# Altium PCB Fuse_layout.PcbDoc
Units mil, origin at the board's own origin, x right, y up, seen from the top; angles counter-clockwise.
Board outline 4500 x 9500 mil, 4 copper layers (Top Layer, GND, Power, Bottom Layer), stack 29.224 mil thick; 152 components, 75 nets, 438 pads, 8 vias.
Unrouted connection lines stored in the file: 156.
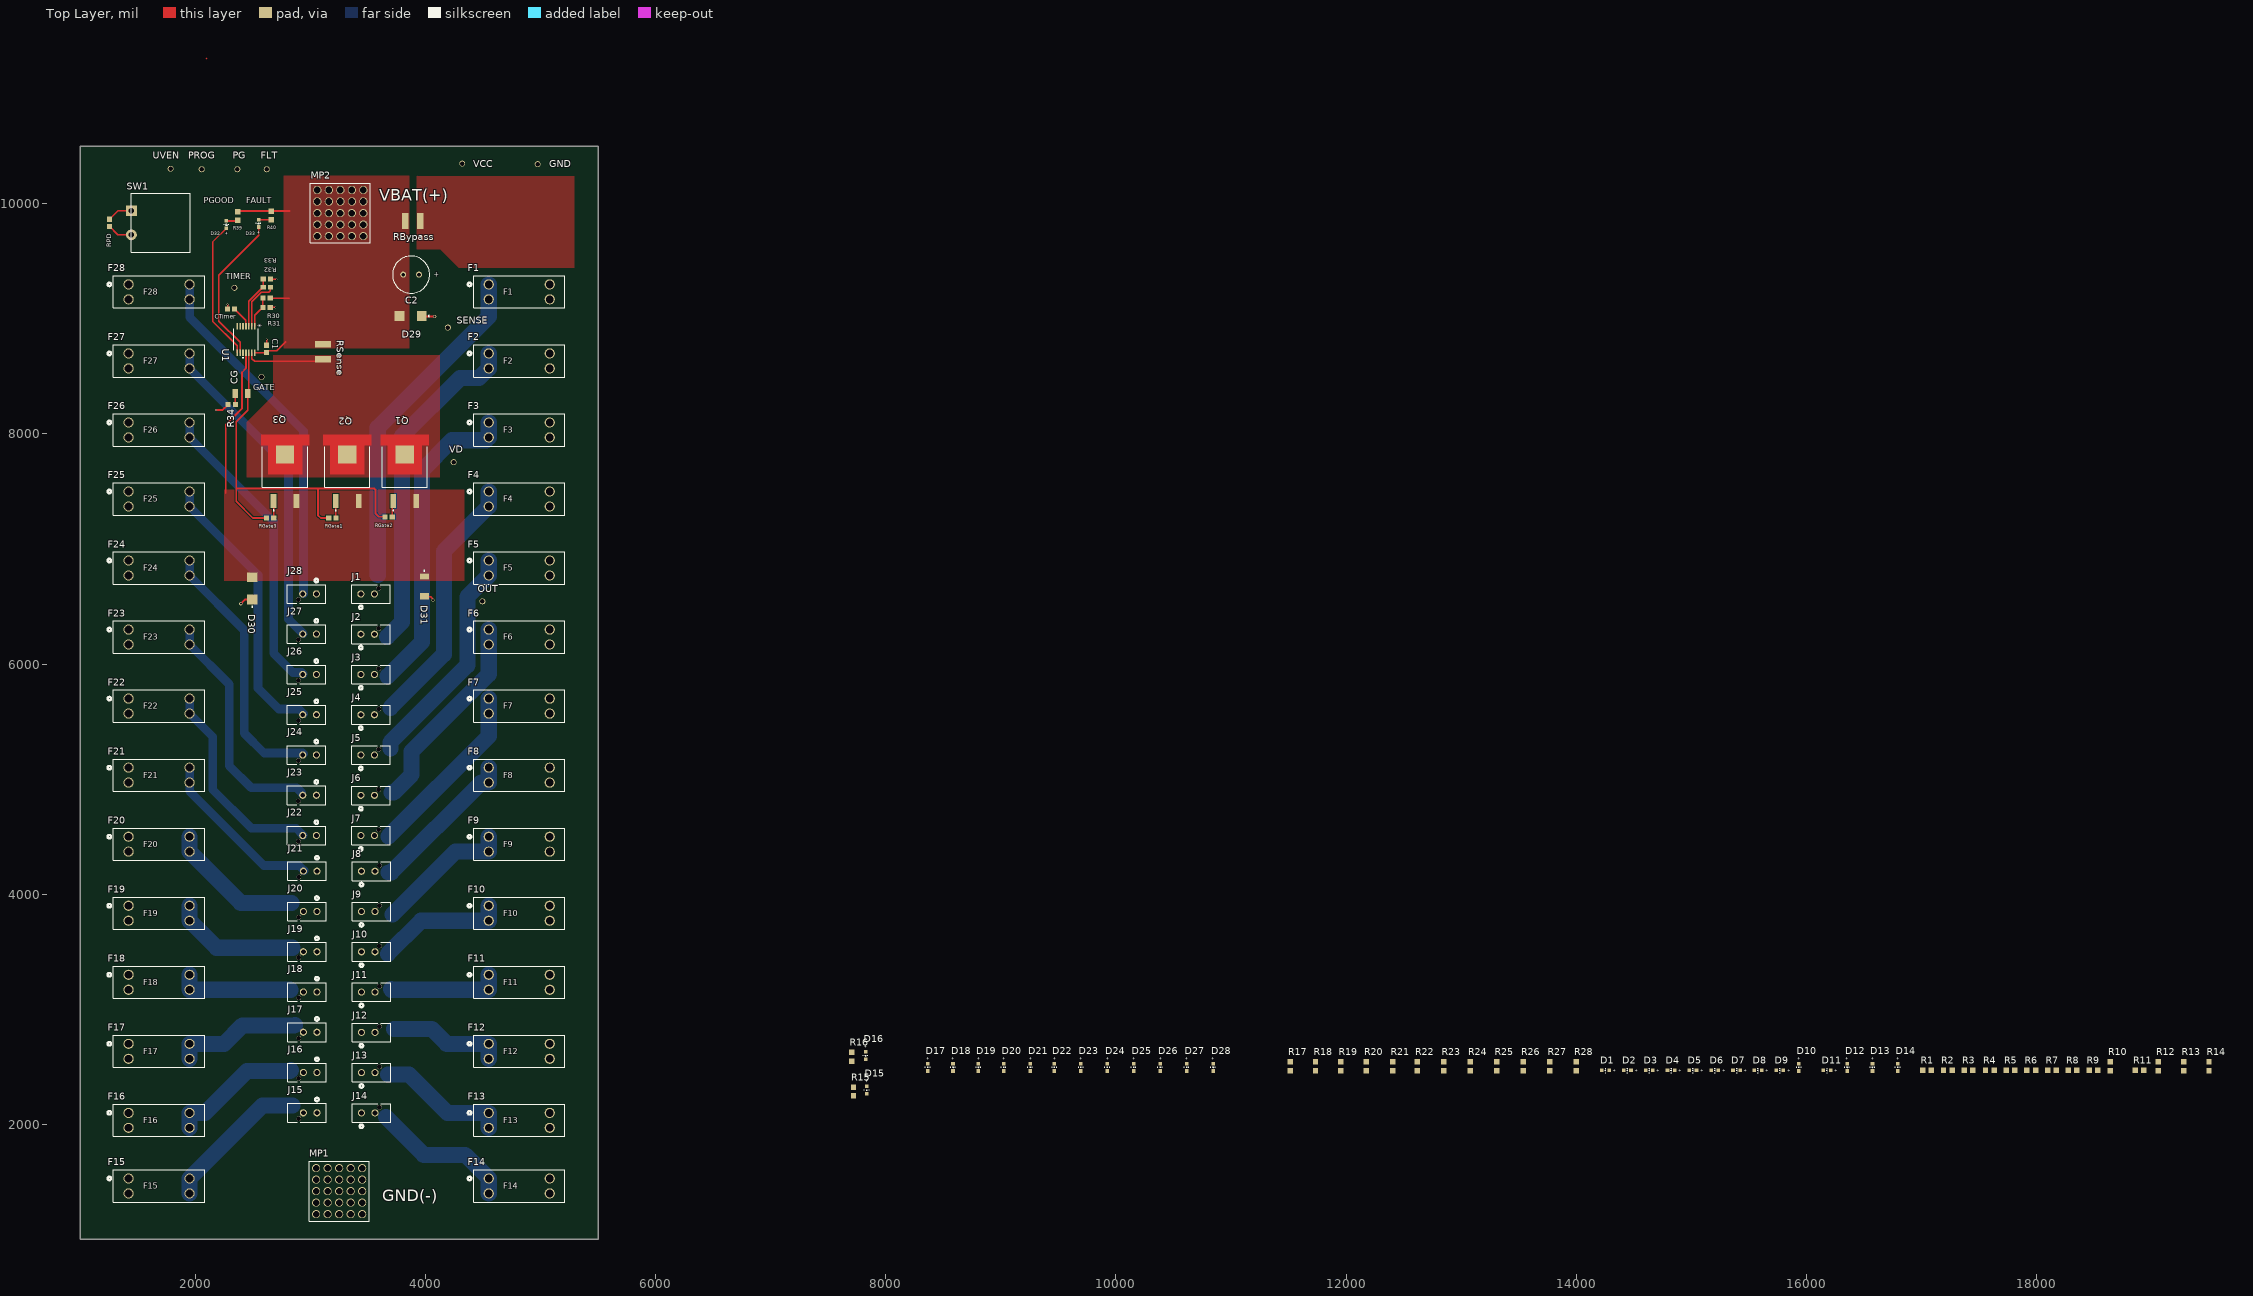
[diagram p0: Top Layer view]
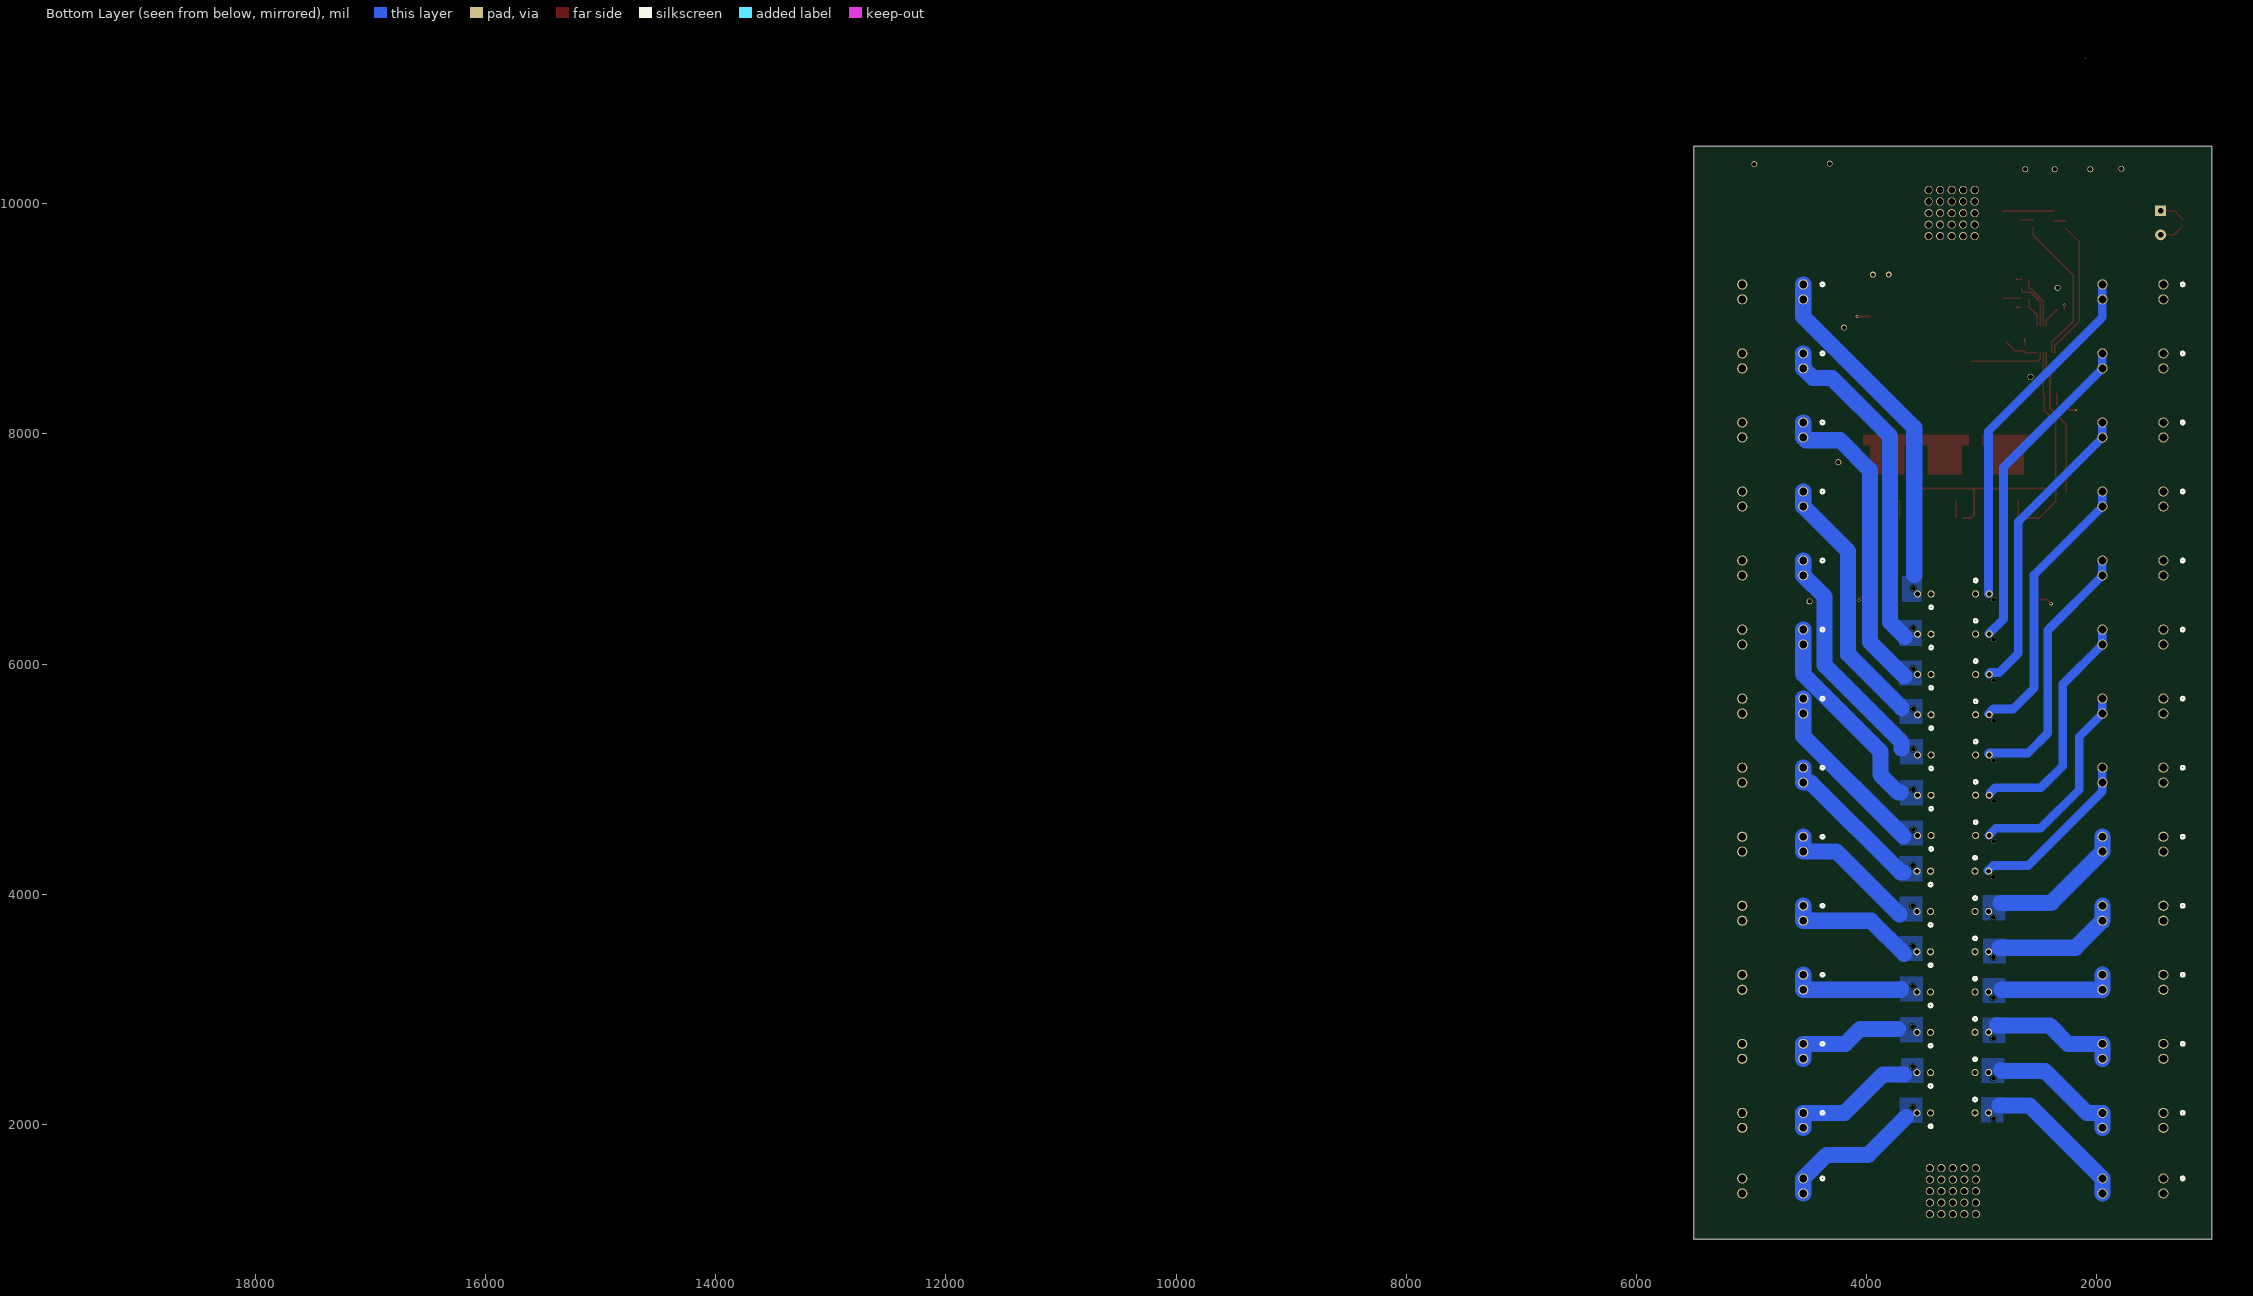
[diagram p1: Bottom Layer view, seen from below]
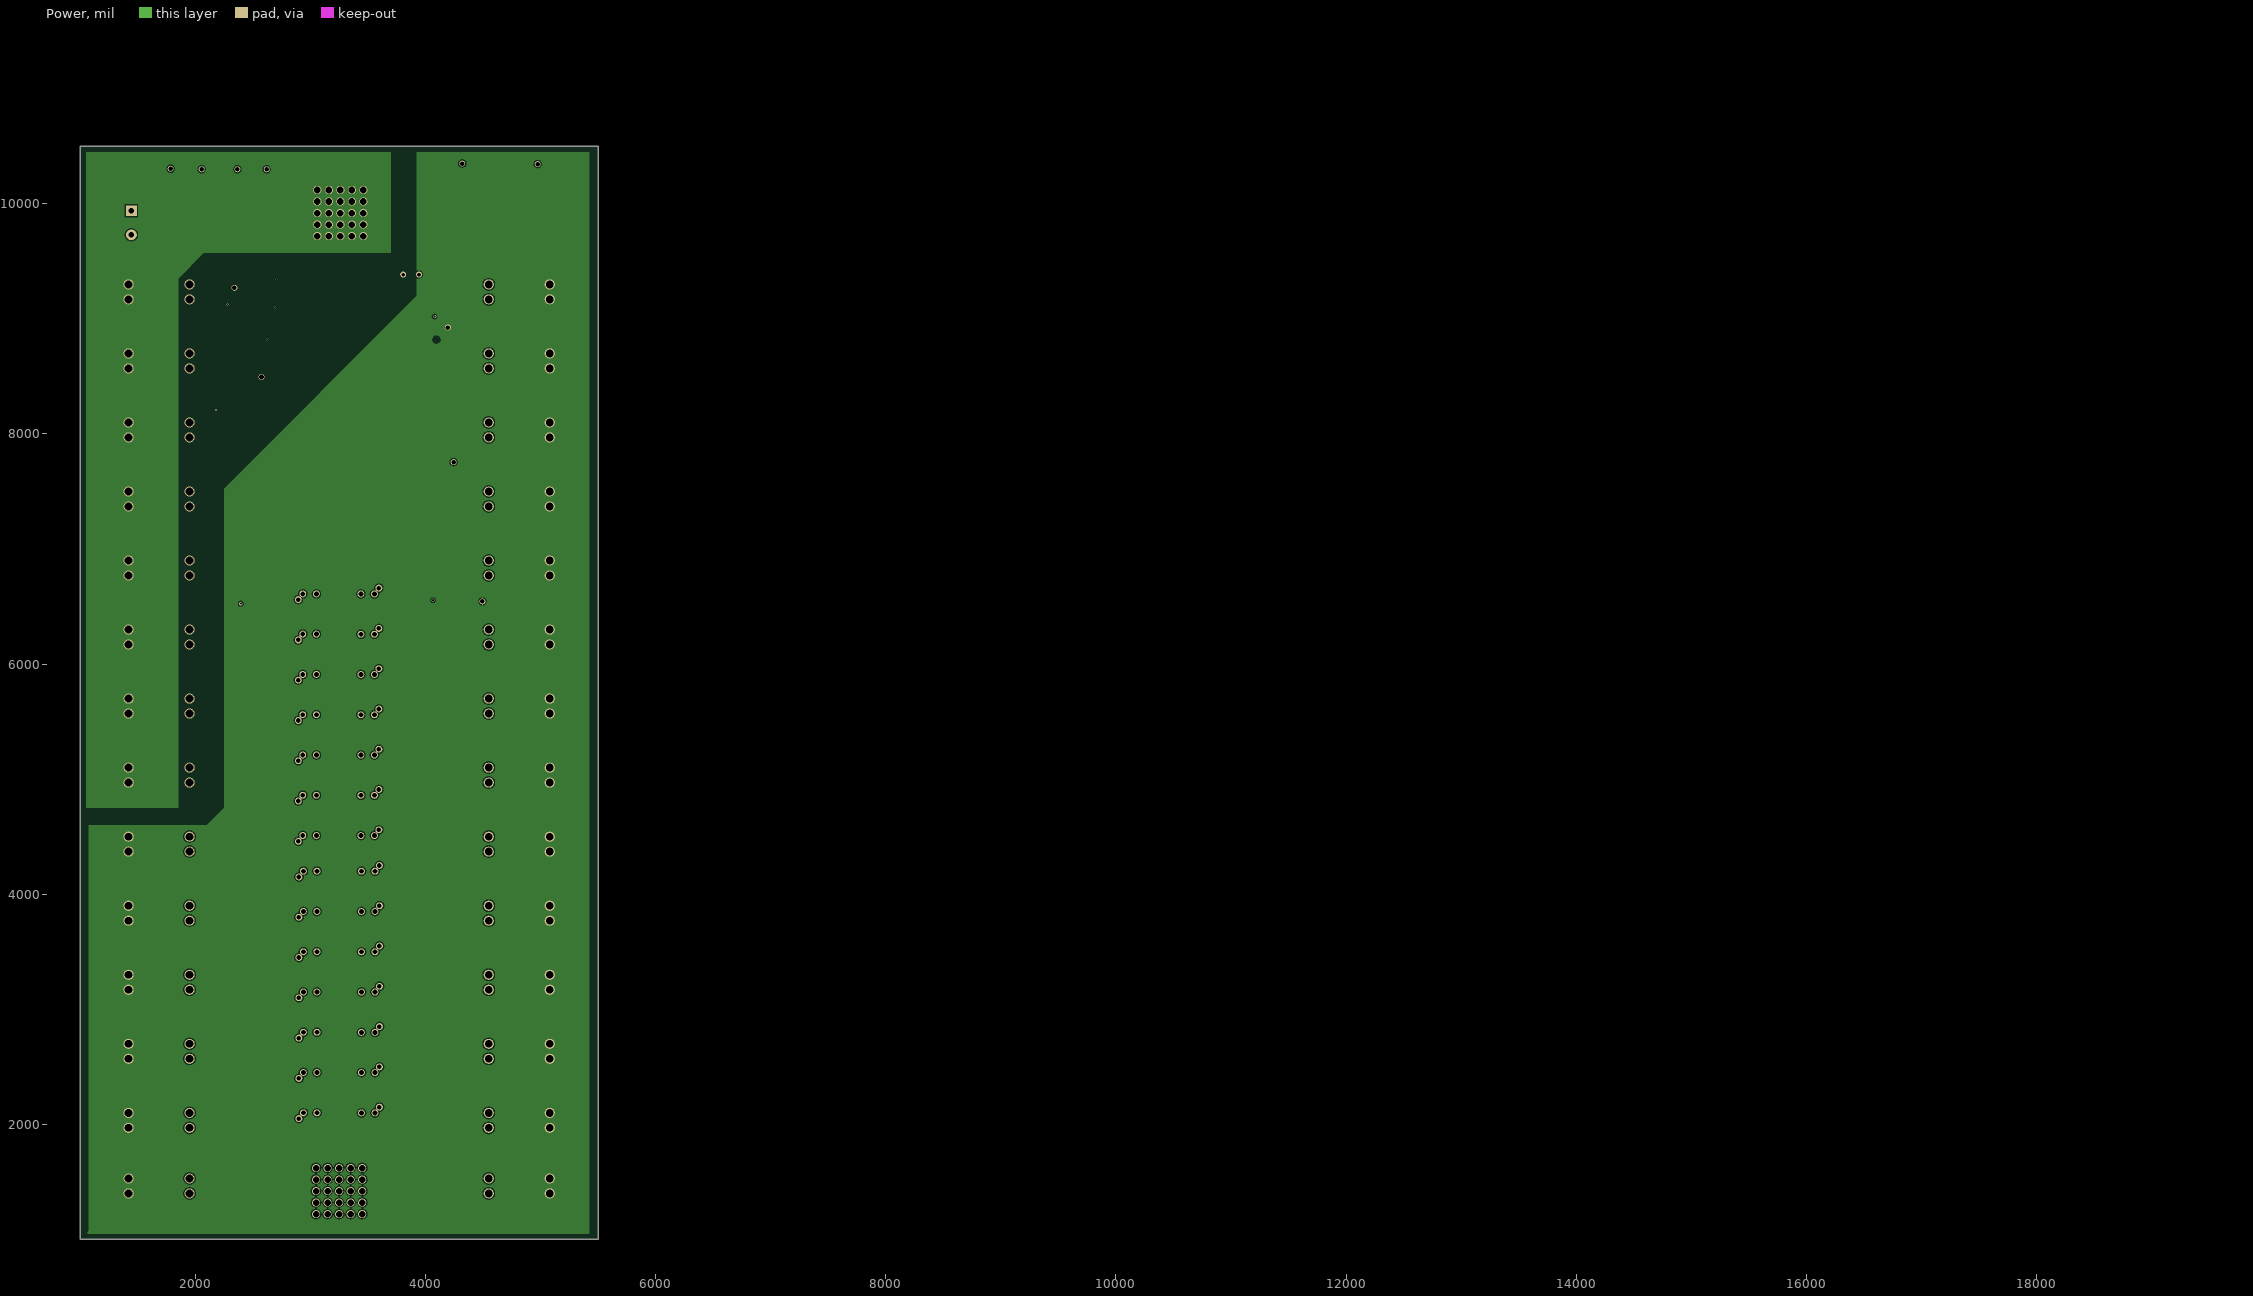
[diagram p2: Power]

## Layer stack, top to bottom
Top Solder: solder mask 0.4, Solder Resist, Dk 3.5
Top Layer: signal copper 2.7559
Dielectric 2: prepreg 2.8, PP-006, Dk 4.1
GND: signal copper 2.7559
Dielectric 1: dielectric 12.6, FR-4, Dk 4.8
Power: signal copper 2.7559
Dielectric 3: prepreg 2.8, PP-006, Dk 4.1
Bottom Layer: signal copper 2.7559
Bottom Solder: solder mask 0.4, Solder Resist, Dk 3.5

## Board outline
1000,1000 5500,1000 5500,10500 1000,10500

## Design rules (kind name [scope] priority, off if disabled: settings)
Clearance [All] p1: gap=10 ignorepadtopadclearanceinfootprint=TRUE
PolygonConnect PolygonConnect_1 [InNet('VBAT') vs InNetClass('Vbat')] p1: connectstyle=Direct reliefconductorwidth=50 reliefentries=4 polygonreliefangle="90 Angle" airgapwidth=10
PolygonConnect [All] p2: connectstyle=Direct reliefconductorwidth=10 reliefentries=4 polygonreliefangle="90 Angle" airgapwidth=10
RoutingVias [All] p1: holewidth=7.87 width=15.75 viastyle="Through Hole" minholewidth=7.87 minwidth=15.75 maxholewidth=17.72 maxwidth=39.37
SolderMaskExpansion [All] p1: expansion=4 istentingtop=FALSE
SupplyNets "Schematic Supply Nets_1" [InNet('GND')] p1: voltage=0.000
SupplyNets "Schematic Supply Nets" [InNet('VBAT')] p2: voltage=0.000
Width [All] p1: maxlimit=500 minlimit=10 preferedwidth=10 minimp=50.000000 maximp=50.000000 favimp=50.000000
30 further rules are at their usual default settings.

## Classes and differential pairs
component class "Status LEDs": D1 D2 D3 D4 D5 D6 D7 D8 D9 D10 D11 D12 D13 D14 D15 D16 D17 D18 D19 D20 D21 D22 D23 D24 D25 D26 D27 D28 R1 R2 R3 R4 R5 R6 R7 R8 R9 R10 R11 R12 R13 R14 R15 R16 R17 R18 R19 R20 R21 R22 R23 R24 R25 R26 R27 R28 RPD SW1
component class Soft_Start: C1 C2 CG CTimer D29 D30 D31 D32 D33 FLT GATE GND OUT PG PROG Q1 Q2 Q3 R30 R31 R32 R33 R34 R39 R40 RBypass RGate1 RGate2 RGate3 RSense SENSE TIMER U1 UVEN VCC VD
component class "Power Distribution": F1 F2 F3 F4 F5 F6 F7 F8 F9 F10 F11 F12 F13 F14 F15 F16 F17 F18 F19 F20 F21 F22 F23 F24 F25 F26 F27 F28 J1 J2 J3 J4 J5 J6 J7 J8 J9 J10 J11 J12 J13 J14 J15 J16 J17 J18 J19 J20 J21 J22 J23 J24 J25 J26 J27 J28 MP1 MP2

## Components (designator, comment, footprint, x,y, rotation, side; value= is the part's Value field where it differs from the comment)
C1 "GRM1885C1H103JA01D" CAP-0603 2620,8740 r90 top
C2 "CAP THRU" WCAP-ATUL_8X11.5(DXL) 3875,9385 r0 top value=47uF
CG "CAP 1206" CAP-1206 2400.87,8350 r180 top
CTimer "CAP 0603" CAP-0603 2310,9085 r180 top
D1 "150060GS75000" WL-SMCW_0603 14255,2470 r0 top
D2 "150060GS75000" WL-SMCW_0603 14445,2470 r0 top
D3 "150060GS75000" WL-SMCW_0603 14635,2470 r0 top
D4 "150060GS75000" WL-SMCW_0603 14825,2470 r0 top
D5 "150060GS75000" WL-SMCW_0603 15015,2470 r0 top
D6 "150060GS75000" WL-SMCW_0603 15205,2470 r0 top
D7 "150060GS75000" WL-SMCW_0603 15395,2470 r0 top
D8 "150060GS75000" WL-SMCW_0603 15580,2470 r0 top
D9 "150060GS75000" WL-SMCW_0603 15770,2470 r0 top
D10 "150060GS75000" WL-SMCW_0603 15935,2495 r90 top
D11 "150060GS75000" WL-SMCW_0603 16180,2470 r0 top
D12 "150060GS75000" WL-SMCW_0603 16355,2495 r90 top
D13 "150060GS75000" WL-SMCW_0603 16575,2495 r90 top
D14 "150060GS75000" WL-SMCW_0603 16795,2495 r90 top
D15 "150060GS75000" WL-SMCW_0603 7835,2298.5 r90 top
D16 "150060GS75000" WL-SMCW_0603 7825,2598.5 r90 top
D17 "150060GS75000" WL-SMCW_0603 8365,2495 r90 top
D18 "150060GS75000" WL-SMCW_0603 8585,2495 r90 top
D19 "150060GS75000" WL-SMCW_0603 8805,2495 r90 top
D20 "150060GS75000" WL-SMCW_0603 9025,2495 r90 top
D21 "150060GS75000" WL-SMCW_0603 9255,2495 r90 top
D22 "150060GS75000" WL-SMCW_0603 9465,2495 r90 top
D23 "150060GS75000" WL-SMCW_0603 9695,2495 r90 top
D24 "150060GS75000" WL-SMCW_0603 9925,2495 r90 top
D25 "150060GS75000" WL-SMCW_0603 10155,2495 r90 top
D26 "150060GS75000" WL-SMCW_0603 10385,2495 r90 top
D27 "150060GS75000" WL-SMCW_0603 10615,2495 r90 top
D28 "150060GS75000" WL-SMCW_0603 10845,2495 r90 top
D29 "SMBJ40CA" "DO-214AA (SMBJ)" 3870,9025 r0 top
D30 "SMBJ40CA" "DO-214AA (SMBJ)" 2495,6659.88 r270 top
D31 "PMEG6030EP,115" DIO-SOD128 3990,6675 r180 top
D32 "150060GS75000" WL-SMCW_0603 2270,9820 r270 top
D33 "LTST-C191KRKT" WL-SMCW_0603 2550,9830 r270 top
F1 "36-3557-2-ND" CONN_3557-2_KEY 4550,9300 r0 top
F2 "36-3557-2-ND" CONN_3557-2_KEY 4550,8700 r0 top
F3 "36-3557-2-ND" CONN_3557-2_KEY 4550,8100 r0 top
F4 "36-3557-2-ND" CONN_3557-2_KEY 4550,7500 r0 top
F5 "36-3557-2-ND" CONN_3557-2_KEY 4550,6900 r0 top
F6 "36-3557-2-ND" CONN_3557-2_KEY 4550,6300 r0 top
F7 "36-3557-2-ND" CONN_3557-2_KEY 4550,5700 r0 top
F8 "36-3557-2-ND" CONN_3557-2_KEY 4550,5100 r0 top
F9 "36-3557-2-ND" CONN_3557-2_KEY 4550,4500 r0 top
F10 "36-3557-2-ND" CONN_3557-2_KEY 4550,3900 r0 top
F11 "36-3557-2-ND" CONN_3557-2_KEY 4550,3300 r0 top
F12 "36-3557-2-ND" CONN_3557-2_KEY 4550,2700 r0 top
F13 "36-3557-2-ND" CONN_3557-2_KEY 4550,2100 r0 top
F14 "36-3557-2-ND" CONN_3557-2_KEY 4550,1530 r0 top
F15 "36-3557-2-ND" CONN_3557-2_KEY 1420,1530 r0 top
F16 "36-3557-2-ND" CONN_3557-2_KEY 1420,2100 r0 top
F17 "36-3557-2-ND" CONN_3557-2_KEY 1420,2700 r0 top
F18 "36-3557-2-ND" CONN_3557-2_KEY 1420,3300 r0 top
F19 "36-3557-2-ND" CONN_3557-2_KEY 1420,3900 r0 top
F20 "36-3557-2-ND" CONN_3557-2_KEY 1420,4500 r0 top
F21 "36-3557-2-ND" CONN_3557-2_KEY 1420,5100 r0 top
F22 "36-3557-2-ND" CONN_3557-2_KEY 1420,5700 r0 top
F23 "36-3557-2-ND" CONN_3557-2_KEY 1420,6300 r0 top
F24 "36-3557-2-ND" CONN_3557-2_KEY 1420,6900 r0 top
F25 "36-3557-2-ND" CONN_3557-2_KEY 1420,7500 r0 top
F26 "36-3557-2-ND" CONN_3557-2_KEY 1420,8100 r0 top
F27 "36-3557-2-ND" CONN_3557-2_KEY 1420,8700 r0 top
F28 "36-3557-2-ND" CONN_3557-2_KEY 1420,9300 r0 top
FLT "5003" TEST-POINT-0001 2620,10300 r0 top
GATE "5003" TEST-POINT-0001 2575,8495 r90 top
GND "5003" TEST-POINT-0001 4975,10345 r0 top
J1 "CONN MF+ 2 PIN VERT" CONN_2068320000-SD_02_MOL 3438.31,6609.61 r270 top
J2 "CONN MF+ 2 PIN VERT" CONN_2068320000-SD_02_MOL 3438.31,6259.61 r270 top
J3 "CONN MF+ 2 PIN VERT" CONN_2068320000-SD_02_MOL 3438.31,5909.61 r270 top
J4 "CONN MF+ 2 PIN VERT" CONN_2068320000-SD_02_MOL 3438.31,5559.61 r270 top
J5 "CONN MF+ 2 PIN VERT" CONN_2068320000-SD_02_MOL 3438.31,5209.61 r270 top
J6 "CONN MF+ 2 PIN VERT" CONN_2068320000-SD_02_MOL 3438.31,4859.61 r270 top
J7 "CONN MF+ 2 PIN VERT" CONN_2068320000-SD_02_MOL 3438.31,4509.61 r270 top
J8 "CONN MF+ 2 PIN VERT" CONN_2068320000-SD_02_MOL 3443.31,4199.61 r270 top
J9 "CONN MF+ 2 PIN VERT" CONN_2068320000-SD_02_MOL 3443.31,3849.61 r270 top
J10 "CONN MF+ 2 PIN VERT" CONN_2068320000-SD_02_MOL 3443.31,3499.61 r270 top
J11 "CONN MF+ 2 PIN VERT" CONN_2068320000-SD_02_MOL 3443.31,3149.61 r270 top
J12 "CONN MF+ 2 PIN VERT" CONN_2068320000-SD_02_MOL 3443.31,2799.61 r270 top
J13 "CONN MF+ 2 PIN VERT" CONN_2068320000-SD_02_MOL 3443.31,2449.61 r270 top
J14 "CONN MF+ 2 PIN VERT" CONN_2068320000-SD_02_MOL 3443.31,2099.61 r270 top
J15 "CONN MF+ 2 PIN VERT" CONN_2068320000-SD_02_MOL 3056.69,2100.39 r90 top
J16 "CONN MF+ 2 PIN VERT" CONN_2068320000-SD_02_MOL 3056.69,2450.39 r90 top
J17 "CONN MF+ 2 PIN VERT" CONN_2068320000-SD_02_MOL 3056.69,2800.39 r90 top
J18 "CONN MF+ 2 PIN VERT" CONN_2068320000-SD_02_MOL 3056.69,3150.39 r90 top
J19 "CONN MF+ 2 PIN VERT" CONN_2068320000-SD_02_MOL 3056.69,3500.39 r90 top
J20 "CONN MF+ 2 PIN VERT" CONN_2068320000-SD_02_MOL 3056.69,3850.39 r90 top
J21 "CONN MF+ 2 PIN VERT" CONN_2068320000-SD_02_MOL 3056.69,4200.39 r90 top
J22 "CONN MF+ 2 PIN VERT" CONN_2068320000-SD_02_MOL 3051.69,4510.39 r90 top
J23 "CONN MF+ 2 PIN VERT" CONN_2068320000-SD_02_MOL 3051.69,4860.39 r90 top
J24 "CONN MF+ 2 PIN VERT" CONN_2068320000-SD_02_MOL 3051.69,5210.39 r90 top
J25 "CONN MF+ 2 PIN VERT" CONN_2068320000-SD_02_MOL 3051.69,5560.39 r90 top
J26 "CONN MF+ 2 PIN VERT" CONN_2068320000-SD_02_MOL 3051.69,5910.39 r90 top
J27 "CONN MF+ 2 PIN VERT" CONN_2068320000-SD_02_MOL 3051.69,6260.39 r90 top
J28 "CONN MF+ 2 PIN VERT" CONN_2068320000-SD_02_MOL 3051.69,6610.39 r90 top
MP1 "732-3278-ND" *WP-SHFU_7461098_HAL 3250,1420 r0 top
MP2 "732-3278-ND" *WP-SHFU_7461098_HAL 3260,9920 r0 top
OUT "5003" TEST-POINT-0001 4495,6545 r0 top
PG "5003" TEST-POINT-0001 2365,10300 r0 top
PROG "5003" TEST-POINT-0001 2055,10300 r90 top
Q1 "PSMN3R7-100BSEJ" TRANS_PSMN3R7-100BSEJ 3820,7670.39 r90 top
Q2 "PSMN3R7-100BSEJ" TRANS_PSMN3R7-100BSEJ 3320,7670.39 r90 top
Q3 "PSMN3R7-100BSEJ" TRANS_PSMN3R7-100BSEJ 2780,7670.39 r90 top
R1 "RA73F2A2K0BTD" RES-0805 17050,2470 r0 top
R2 "RA73F2A2K0BTD" RES-0805 17230,2470 r0 top
R3 "RA73F2A2K0BTD" RES-0805 17410,2470 r0 top
R4 "RA73F2A2K0BTD" RES-0805 17595,2470 r0 top
R5 "RA73F2A2K0BTD" RES-0805 17775,2470 r0 top
R6 "RA73F2A2K0BTD" RES-0805 17955,2470 r0 top
R7 "RA73F2A2K0BTD" RES-0805 18135,2470 r0 top
R8 "RA73F2A2K0BTD" RES-0805 18315,2470 r0 top
R9 "RA73F2A2K0BTD" RES-0805 18495,2470 r0 top
R10 "RA73F2A2K0BTD" RES-0805 18640,2505 r90 top
R11 "RA73F2A2K0BTD" RES-0805 18895,2470 r0 top
R12 "RA73F2A2K0BTD" RES-0805 19060,2505 r90 top
R13 "RA73F2A2K0BTD" RES-0805 19280,2505 r90 top
R14 "RA73F2A2K0BTD" RES-0805 19500,2505 r90 top
R15 "RA73F2A2K0BTD" RES-0805 7720,2285 r90 top
R16 "RA73F2A2K0BTD" RES-0805 7705,2587.6 r90 top
R17 "RA73F2A2K0BTD" RES-0805 11515,2505 r90 top
R18 "RA73F2A2K0BTD" RES-0805 11735,2505 r90 top
R19 "RA73F2A2K0BTD" RES-0805 11955,2505 r90 top
R20 "RA73F2A2K0BTD" RES-0805 12175,2505 r90 top
R21 "RA73F2A2K0BTD" RES-0805 12405,2505 r90 top
R22 "RA73F2A2K0BTD" RES-0805 12620,2505 r90 top
R23 "RA73F2A2K0BTD" RES-0805 12850,2505 r90 top
R24 "RA73F2A2K0BTD" RES-0805 13080,2505 r90 top
R25 "RA73F2A2K0BTD" RES-0805 13310,2505 r90 top
R26 "RA73F2A2K0BTD" RES-0805 13540,2505 r90 top
R27 "RA73F2A2K0BTD" RES-0805 13770,2505 r90 top
R28 "RA73F2A2K0BTD" RES-0805 14000,2505 r90 top
R30 "RES 0603" RES-0603 2619.49,9180 r0 top
R31 "RT0603DRD0710KL" RES-0603 2619.49,9100 r0 top
R32 "ERJ-3EKF4122V" RES-0603 2621.5,9275 r180 top
R33 "ERJ-3EKF2001V" RES-0603 2621.5,9345 r0 top
R34 "RES 0603" RES-0603 2316.5,8255 r0 top
R39 "ERJ-P06F1002V" RES-0805 2370,9895 r270 top
R40 "ERJ-P06F1002V" RES-0805 2660,9900 r270 top
RBypass "RES 2512" RES-2512 3890,9850 r0 top
RGate1 "CRCW060310R0FKEA" RES-0603 3190,7270 r180 top
RGate2 "CRCW060310R0FKEA" RES-0603 3680,7280 r180 top
RGate3 "CRCW060310R0FKEA" RES-0603 2650,7270 r180 top
RPD "RES 0603" RES-0603 1255,9835 r270 top
RSense "VMS-R010-1.0-U" RES-2512 3110,8715 r270 top
SENSE "5003" TEST-POINT-0001 4195,8925 r90 top
SW1 "GPTS203211B" BUTTON-0002 1700,9835 r180 top
TIMER "5003" TEST-POINT-0001 2340,9270 r90 top
U1 "IC-TPS2493PWR" PW14 2440,8820 r270 top
UVEN "5003" TEST-POINT-0001 1785,10305 r90 top
VCC "5003" TEST-POINT-0001 4320,10350 r0 top
VD "5003" TEST-POINT-0001 4245,7755 r0 top

## Footprints (in the part's own frame and the unit in brackets; to place one, negate y for a bottom-side part, rotate by r counter-clockwise, add the part's x,y. Pads: shape width x height; smd on the part's side, far side on the other; paste and mask are expansions set on the pad)
*WP-SHFU_7461098_HAL [mm]
  round 1.8 hole 1.45: 1(-5.08,5.08) 2(-2.54,5.08) 3(0,5.08) 4(2.54,5.08) 5(5.08,5.08) 6(5.08,2.54) 7(2.54,2.54) 8(0,2.54) 9(-2.54,2.54) 10(-5.08,2.54) 11(-5.08,0) 12(-2.54,0) 13(0,0) 14(2.54,0) 15(5.08,0) 16(5.08,-2.54) 17(2.54,-2.54) 18(0,-2.54) 19(-2.54,-2.54) 20(-5.08,-2.54) 21(-5.08,-5.08) 22(-2.54,-5.08) 23(0,-5.08) 24(2.54,-5.08) 25(5.08,-5.08)
  silkscreen extent -6.6,-6.6 6.6,6.6
BUTTON-0002 [mm]
  rect 2.4x2.4 hole 1.2: 1(6.5,-2.65)
  round 2.4 hole 1.2: 2(6.5,2.65)
  silkscreen extent -6.5,-6.5 6.5,6.5
CAP-0603 [mm]
  rect 1.15x1.1 smd: 1(-0.8,0) 2(0.8,0)
  body extent -0.8,-0.45 0.8,0.45, height 0.8
CAP-1206 [mm]
  rect 1.25x2 smd: 1(-1.375,0) 2(1.375,0)
  body extent -1.6,-0.8 1.6,0.8, height 1.5
CONN_3557-2_KEY [mil]
  round 88 hole 68 paste-99999 mask+0: 1_1(0,0) 1_2(0,-130) 2_1(530,0) 2_2(530,-130)
  silkscreen extent -182,-205 662,75
CONN_2068320000-SD_02_MOL [mil]
  round 62 / inner round 60 / far side round 62 hole 42 paste-99999 mask+0: 1(0,0) 2(0,118.11)
  round 40 / inner round 60 / far side round 40 hole 40 unplated paste-99999 mask+0: 3(-50.39,156.69)
  silkscreen extent -81,-81 131,254, body extent -76,-76 76,249, height 392
DIO-SOD128 [mm]
  rect 2x1.4 smd: 1(0,2.2) 2(0,-2.2)
  silkscreen extent -0.13,-3.55 0.12,-3.3, body extent -1.25,-2.35 1.25,2.35, height 1.05
"DO-214AA (SMBJ)" [mm]
  rect 2.16x2.26 smd: 1(-2.416,0) 2(2.484,0)
  silkscreen extent 3.94,-0.12 4.19,0.12, body extent -2.72,-1.95 2.78,1.95, height 2.45
PW14 [mil]
  rect 57.56x13.97 smd paste+0 mask+0: 1(-115,76.77) 2(-115,51.18) 3(-115,25.59) 4(-115,0) 5(-115,-25.59) 6(-115,-51.18) 7(-115,-76.77) 8(115,-76.77) 9(115,-51.18) 10(115,-25.59) 11(115,0) 12(115,25.59) 13(115,51.18) 14(115,76.77)
  silkscreen extent -94,-106 164,106, body extent -130,-101 130,101, height 47
RES-0603 [mm]
  rect 1.15x1.1 smd: 1(-0.8,0) 2(0.8,0)
  body extent -0.8,-0.4 0.8,0.4, height 0.43
RES-0805 [mm]
  rect 1.2x1.2 smd: 1(-0.95,0) 2(0.95,0)
  body extent -1,-0.6 1,0.6, height 0.71
RES-2512 [mm]
  rect 1.45x3.5 smd: 1(-1.65,0) 2(1.65,0)
TEST-POINT-0001 [mm] "2024 miniature test point"
  round 1.3 hole 1: 1(0,0)
  body extent -1.27,-1.27 1.27,1.27, height 4.57
TRANS_PSMN3R7-100BSEJ [mm]
  rect 3.1x1.3 smd paste-3: 1(-6.4,2.54) 3(-6.4,-2.54)
  rect 4x4 smd paste-3 mask+0: MB(3.8,0)
  Top Layer region: 8.15,-5.3 5.9,-5.3 5.9,-3.75 -0.55,-3.75 -0.55,3.75 5.9,3.75 5.9,5.3 8.15,5.3
  silkscreen extent -8.6,-5 5.58,5, body extent -7.65,-5 7.65,5, height 4.5
WCAP-ATUL_8X11.5(DXL) [mm]
  round 1.308 hole 0.8: 1(1.75,0) 2(-1.75,0)
  silkscreen extent -4.1,-4.1 4.1,4.1
WL-SMCW_0603 [mm]
  rect 0.8x0.8 smd: 1(-0.8,0) 2(0.8,0)
  silkscreen extent -0.13,-0.5 0.11,0.5, body extent -0.84,-0.38 0.76,0.42, height 0.7

## Part data
C1: library part "CAP 0603", "10000 pF ±5% 50V Ceramic Capacitor C0G, NP0 0603 (1608 Metric)", Capacitance=0.1uF, Voltage Rating=50V
C2: "47 µF 100 V Aluminum Electrolytic Capacitors Radial, Can 7000 Hrs @ 105°C", Package=None, Availability=Unavailable, MF="{'manufacturer': u'W\xfcrth Elektronik'}", MP=860040674004, Price=None
CG: "0.082 µF ±5% 50V Ceramic Capacitor C0G, NP0 1206 (3216 Metric)", Capacitance=0.082uF, Voltage Rating=50V
CTimer: "10000 pF ±5% 50V Ceramic Capacitor C0G, NP0 0603 (1608 Metric)", Capacitance=0.010uF, Voltage Rating=50V
D1 D2 D3 D4 D5 D6 D7 D8 D9 D10 D11 D12 D13 D14 D15 D16 D17 D18 D19 D20 D21 D22 D23 D24 D25 D26 D27 D28 D32: library part LED-0002, "Green 520nm LED Indication - Discrete 3.2V 0603 (1608 Metric)", Current=20mA, Voltage=3.2V
D29 D30: library part DIO-TVS-0001, "TVS DIODE 40VWM 64.5VC DO214AA", Current Rating=9.3A, Voltage Rating=64.5V, ComponentLink1Description=Datasheet, ComponentLink1URL=https://www.littelfuse.com/media?resourcetype=datasheets&itemid=09a6ae9a-73cb-4ac4-acac-e6dab92ab953&filename=littelfuse_tvs_diode_smbj_datasheet.pdf
D31: library part DIO-SCHOTTKY-0003, "DIODE SCHOTTKY 60V 3A SOD128", Current Rating=3A, Reverse Voltage=60V, ComponentLink1Description=Datasheet, ComponentLink1URL=https://assets.nexperia.com/documents/data-sheet/PMEG6030EP.pdf
D33: library part LED-0002, "Red 631nm LED Indication - Discrete 2V 0603 (1608 Metric)", Current=20mA, Voltage=2V
F1 F2 F3 F4 F5 F6 F7 F8 F9 F10 F11 F12 F13 F14 F15 F16 F17 F18 F19 F20 F21 F22 F23 F24 F25 F26 F27 F28: library part FUSE-0002, "Fuse Block 30 A 500V 1 Circuit Blade Through Hole / MINI ATO FUSE", Package="Nonstandard Keystone", Availability="In Stock", Check_prices=https://www.snapeda.com/parts/3557-2/Keystone+Electronics/view-part/?ref=eda, MF="Keystone Electronics", MP=3557-2, Price=None, Purchase-URL=https://pricing.snapeda.com/search/part/3557-2/?ref=eda, SnapEDA_Link=https://www.snapeda.com/parts/3557-2/Keystone+Electronics/view-part/?ref=snap
FLT GATE GND OUT PG PROG SENSE TIMER UVEN VCC VD: library part TEST-POINT-0001, "Oranange PC Test Point, Miniature Phoisphor Bronze Silver Plating Through Hole Mounting Type"
J1 J2 J3 J4 J5 J6 J7 J8 J9 J10 J11 J12 J13 J14 J15 J16 J17 J18 J19 J20 J21 J22 J23 J24 J25 J26 J27 J28: "Micro-Fit+ Vertical Header, Through Hole, 3.00mm Pitch, Dual Row, 2 Circuits, Tin (Sn) Plating, Glow-Wire Capable, Black, Tray", Manufacturer_Name="Molex Connector Corporation", Manufacturer_Part_Number=2068320201, Copyright="Copyright (C) 2025 Ultra Librarian. All rights reserved.", RefDes=RefDes, Type=Type
MP1 MP2: library part CONN-1POS-0002, "25 Pin Shank Terminal M6 Through Hole", Package=None, Availability=Unavailable, Check_prices=https://www.snapeda.com/parts/7461098/W%25C3%25BCrth+Elektronik+Midcom/view-part/?ref=eda, MF="WÃ¼rth Elektronik", MP=7461098, Price=None, SnapEDA_Link=https://www.snapeda.com/parts/7461098/W%25C3%25BCrth+Elektronik+Midcom/view-part/?ref=snap
Q1 Q2 Q3: "N-Channel 100 V 120A (Ta) 405W (Ta) Surface Mount D2PAK", Package="D2PAK-3 Nexperia USA Inc.", Check_prices=https://www.snapeda.com/parts/PSMN3R7-100BSEJ/Nexperia/view-part/?ref=eda, MF="Nexperia USA Inc.", MP=PSMN3R7-100BSEJ, SnapEDA_Link=https://www.snapeda.com/parts/PSMN3R7-100BSEJ/Nexperia/view-part/?ref=snap
R1 R2 R3 R4 R5 R6 R7 R8 R9 R10 R11 R12 R13 R14 R15 R16 R17 R18 R19 R20 R21 R22 R23 R24 R25 R26 R27 R28: library part RES-2K-0001, "2 kOhms ±0.1% 1W Chip Resistor 0805 (2012 Metric) Thin Film", Resistance=2K, Wattage="1 W"
R30: Resistance=210K, Wattage=1/10W
R31: library part "RES 0603", "10 kOhms ±0.5% 0.1W, 1/10W Chip Resistor 0603 (1608 Metric) Thin Film", Resistance=10K, Wattage=1/10W
R32: library part "RES 0603", "41.2 kOhms ±1% 0.1W, 1/10W Chip Resistor 0603 (1608 Metric) Automotive AEC-Q200 Thick Film", Resistance=41.2K, Wattage=1/10W
R33: library part "RES 0603", "4.99 kOhms ±0.1% 0.1W, 1/10W Chip Resistor 0603 (1608 Metric) Anti-Sulfur, Automotive AEC-Q200 Thin Film", Resistance=4.99K, Wattage=1/10W
R34: "1 kOhms ±0.1% 0.1W, 1/10W Chip Resistor 0603 (1608 Metric) Anti-Sulfur, Automotive AEC-Q200 Thin Film", Resistance=1K, Wattage=1/10W
R39 R40: library part "RES 0805", "RES SMD 10K OHM 1% 1/2W 0805", Resistance=10K, Wattage=1/2W
RBypass: "2 mOhms ±1% 3W Chip Resistor 2512 (6332 Metric) Automotive AEC-Q200, Current Sense, Moisture Resistant Metal Element", Resistance=0.002R, Wattage=3W
RGate1 RGate2 RGate3: library part "RES 0603", "10 Ohms ±1% 0.1W, 1/10W Chip Resistor 0603 (1608 Metric) Automotive AEC-Q200 Thick Film", Resistance=10R, Wattage=1/10W
RPD: Resistance=1M, Wattage=1/10W
RSense: library part "RES 2512", "2 mOhms ±1% 3W Chip Resistor 2512 (6332 Metric) Automotive AEC-Q200, Current Sense, Moisture Resistant Metal Element", Resistance=0.002R, Wattage=3W
SW1: library part BUTTON-0002, "Pushbutton Switch SPST Standard Through Hole", Current=1A, Voltage=30V
U1: "9-V to 80-V hot swap controller with power limiting, Auto Retry and analog current monitor 14-TSSOP -40 to 125", Manufacturer_Name="Texas Instruments", Manufacturer_Part_Number=TPS2493PWR, Copyright="Copyright (C) 2026 Ultra Librarian. All rights reserved.", RefDes=RefDes, Type=Type

## Via types
v1: diameter 15.75, hole 7.87, Top Layer to Bottom Layer, 5 vias
v2: diameter 27.56, hole 17.72, Top Layer to Bottom Layer, 3 vias

## Nets (pads, with @x,y where several pads share a name; then routed paths per layer and width w, separated by ;. In a path a pad name is that pad's centre, name@x,y a point inside that pad or via, vN(x,y) a via of type N, cw(c..) or ccw(c..) an arc to the next point about the centre after c; other vN are vias at no path point)
GATE: CG.1 GATE.1 RGate1.2 RGate2.2 RGate3.2 U1.12 | length 3512.9
  Top Layer w13.78: CG.1@2465.59,8360.59 U1.12
  Top Layer w15.75: CG.1@2465.59,8360.59 CG.1 2455,8205 2355,8105 2355,7530 ; RGate3.2 2500,7270 2355,7415 2355,7530 ; RGate1.2 3090,7270 3065,7295 3065,7520 3060,7525 ; RGate2.2 3595,7280 3565,7310 3565,7515.77 3555.78,7525 3060,7525 ; 2355,7530 2360,7525 3060,7525
GND: C1.2 C2.1 CTimer.2 D29.2 D30.2 D31.1 GND.1 J1.1 J2.1 J3.1 J4.1 J5.1 J6.1 J7.1 J8.1 J9.1 J10.1 J11.1 J12.1 J13.1 J14.1 J15.1 J16.1 J17.1 J18.1 J19.1 J20.1 J21.1 J22.1 J23.1 J24.1 J25.1 J26.1 J27.1 J28.1 MP1.1 MP1.2 MP1.3 MP1.4 MP1.5 MP1.6 MP1.7 MP1.8 MP1.9 MP1.10 MP1.11 MP1.12 MP1.13 MP1.14 MP1.15 MP1.16 MP1.17 MP1.18 MP1.19 MP1.20 MP1.21 MP1.22 MP1.23 MP1.24 MP1.25 R31.2 R33.2 R34.1 RPD.1 SW1.1 U1.5 U1.7 | length 855.9
  Top Layer w11.81: CTimer.2 2280,9086.5 v1(2280,9125) ; R31.2 v1(2695,9100) ; R33.2 v1(2706.5,9345)
  Top Layer w15: RPD.1 1255,9867.48 1269.15,9881.63 1270.14,9881.63 1327.83,9939.33 SW1.1 ; C1.2 v1(2620,8820)
  Top Layer w15.75: v1(2179.33,8209.33) 2238.34,8209.33 2284.02,8255 R34.1 ; v2(2395,6525) 2432.09,6562.09 D30.2 ; D29.2 D29.2@3972.8,9020 ; D31.1 3993.39,6585 4045,6585 4063.96,6566.04 4063.96,6557.26 v2(4066.22,6555)
  Top Layer w19.68: D29.2@3972.8,9020 v2(4080,9020)
NetCG_2: CG.2 R34.2 | length 95.1
  Top Layer w15.75: R34.2@2346.5,8255 2346.5,8349.76 CG.2
NetD1_1: D1.1 R1.2
NetD1_2: D1.2 D2.2 D3.2 D4.2 D5.2 D6.2 D7.2 D8.2 D9.2 D10.2 D11.2 D12.2 D13.2 D14.2 D15.2 D16.2 D17.2 D18.2 D19.2 D20.2 D21.2 D22.2 D23.2 D24.2 D25.2 D26.2 D27.2 D28.2 RPD.2 SW1.2 | length 219.8
  Top Layer w15: RPD.2 1255,9802.52 1326.85,9730.67 SW1.2
NetD2_1: D2.1 R2.2
NetD3_1: D3.1 R3.2
NetD4_1: D4.1 R4.2
NetD5_1: D5.1 R5.2
NetD6_1: D6.1 R6.2
NetD7_1: D7.1 R7.2
NetD8_1: D8.1 R8.2
NetD9_1: D9.1 R9.2
NetD10_1: D10.1 R10.2
NetD11_1: D11.1 R11.2
NetD12_1: D12.1 R12.2
NetD13_1: D13.1 R13.2
NetD14_1: D14.1 R14.2
NetD15_1: D15.1 R15.2
NetD16_1: D16.1 R16.2
NetD17_1: D17.1 R17.2
NetD18_1: D18.1 R18.2
NetD19_1: D19.1 R19.2
NetD20_1: D20.1 R20.2
NetD21_1: D21.1 R21.2
NetD22_1: D22.1 R22.2
NetD23_1: D23.1 R23.2
NetD24_1: D24.1 R24.2
NetD25_1: D25.1 R25.2
NetD26_1: D26.1 R26.2
NetD27_1: D27.1 R27.2
NetD28_1: D28.1 R28.2
NetD32_1: D32.1 R39.2 | length 102.5
  Top Layer w15: D32.1 2363.9,9851.5 R39.2
NetD33_1: D33.1 R40.2 | length 110.5
  Top Layer w15: D33.1 2658.9,9861.5 R40.2
NetF1_1_1: F1.1_1 F1.1_2 J1.2 R1.1 | length 2924.9
  Bottom Layer w140: 3585,6774.85 3585,8055 4550,9020 F1.1_1
NetF2_1_1: F2.1_1 F2.1_2 J2.2 R2.1 | length 2924.7
  Bottom Layer w140: 3667.5,6237.5 3795,6365 3795,7980 4300,8485 4465,8485 F2.1_2 F2.1_1
NetF3_1_1: F3.1_1 F3.1_2 J3.2 R3.1 | length 2742.7
  Bottom Layer w140: 3670.71,5894.29 3970,6193.58 3970,7685 4230,7945 4525,7945 F3.1_2 F3.1_1
NetF4_1_1: F4.1_1 F4.1_2 J4.2 R4.1 | length 2234.2
  Bottom Layer w140: 3695,5620 4160,6085 4160,6980 F4.1_2 F4.1_1
NetF5_1_1: F5.1_1 F5.1_2 J5.2 R5.1 | length 1989.2
  Bottom Layer w140: 3695,5264.95 3695,5320 4365,5990 4365,6585 F5.1_2 F5.1_1
NetF6_1_1: F6.1_1 F6.1_2 J6.2 R6.1 | length 1777.8
  Bottom Layer w140: 3705,4882.5 3722.5,4882.5 3880,5040 3880,5242.13 4550,5912.13 F6.1_2 F6.1_1
NetF7_1_1: F7.1_1 F7.1_2 J7.2 R7.1 | length 1559.3
  Bottom Layer w140: 3678.21,4501.79 4550,5373.58 F7.1_2 F7.1_1
NetF8_1_1: F8.1_1 F8.1_2 J8.2 R8.1 | length 1322.7
  Bottom Layer w140: 3680.71,4189.29 3704.29,4189.29 4485,4970 F8.1_2 F8.1_1
NetF9_1_1: F9.1_1 F9.1_2 J9.2 R9.1 | length 1191.7
  Bottom Layer w140: 3714.35,3824.35 4260,4370 F9.1_2 F9.1_1
NetF10_1_1: F10.1_1 F10.1_2 J10.2 R10.1 | length 1126.2
  Bottom Layer w140: 3673.21,3481.79 3961.42,3770 F10.1_2 F10.1_1
NetF11_1_1: F11.1_1 F11.1_2 J11.2 R11.1 | length 982.1
  Bottom Layer w140: 3700,3175 3705,3170 F11.1_2 F11.1_1
NetF12_1_1: F12.1_1 F12.1_2 J12.2 R12.1 | length 1008.8
  Bottom Layer w140: 3725,2830 4055,2830 4185,2700 F12.1_1 F12.1_2
NetF13_1_1: F13.1_1 F13.1_2 J13.2 R13.1 | length 1142.8
  Bottom Layer w140: 3675.71,2434.29 3855.71,2434.29 4190,2100 F13.1_1 F13.1_2
NetF14_1_1: F14.1_1 F14.1_2 J14.2 R14.1 | length 1245.6
  Bottom Layer w140: 3655.71,2064.29 3985,1735 4345,1735 F14.1_1 F14.1_2
NetF15_2_1: F15.2_1 F15.2_2 J15.2 R15.1 | length 1288
  Bottom Layer w140: F15.2_2 F15.2_1 2585,2165 2845,2165
NetF16_2_1: F16.2_1 F16.2_2 J16.2 R16.1 | length 1162.8
  Bottom Layer w140: F16.2_2 F16.2_1 2085,2100 2450,2465 2823.58,2465 2829.29,2470.71
NetF17_2_1: F17.2_1 F17.2_2 J17.2 R17.1 | length 1113.3
  Bottom Layer w140: F17.2_2 F17.2_1 2250,2700 2410,2860 2860,2860 2865,2865
NetF18_2_1: F18.2_1 F18.2_2 J18.2 R18.1 | length 1007.5
  Bottom Layer w140: F18.2_1 F18.2_2 2825,3170 2826.79,3168.21
NetF19_2_1: F19.2_1 F19.2_2 J19.2 R19.1 | length 1122.3
  Bottom Layer w140: F19.2_1 F19.2_2 2185,3535 2845,3535
NetF20_2_1: F20.2_1 F20.2_2 J20.2 R20.1 | length 1199.3
  Bottom Layer w140: F20.2_1 F20.2_2 2395,3925 2835,3925
NetF21_2_1: F21.2_1 F21.2_2 J21.2 R21.1 | length 1484.5
  Bottom Layer w75: F21.2_1 1950,4895 2595,4250 2900,4250 J21.2@2944.09,4205.91
NetF22_2_1: F22.2_1 F22.2_2 J22.2 R22.1 | length 1823.8
  Bottom Layer w75: F22.2_1 F22.2_2 2150,5370 2150,4910 2485,4575 2875,4575 2936.36,4513.64 J22.2@2936.82,4513.64
NetF23_2_1: F23.2_1 F23.2_2 J23.2 R23.1 | length 2060.9
  Bottom Layer w75: F23.2_1 F23.2_2 2295,5825 2295,5115 2485,4925 2881.07,4925 2925,4881.07 J23.2@2925,4875
NetF24_2_1: F24.2_1 F24.2_2 J24.2 R24.1 | length 2286.1
  Bottom Layer w75: F24.2_1 F24.2_2 2425,6295 2425,5400 2597.5,5227.5 2931.42,5227.5 J24.2@2939.54,5219.38
NetF25_2_1: F25.2_1 F25.2_2 J25.2 R25.1 | length 2442.6
  Bottom Layer w75: F25.2_1 F25.2_2 2545,6775 2545,5790 2725,5610 2900,5610 J25.2@2940,5570
NetF26_2_1: F26.2_1 F26.2_2 J26.2 R26.1 | length 2639.3
  Bottom Layer w75: F26.2_1 F26.2_2 2680,7240 2680,6095 2847.5,5927.5 2922.96,5927.5 J26.2@2936.82,5913.64
NetF27_2_1: F27.2_1 F27.2_2 J27.2 R27.1 | length 2845.7
  Bottom Layer w75: F27.2_1 F27.2_2 2810,7710 2810,6390 J27.2@2936.88,6263.12
NetF28_2_1: F28.2_1 F28.2_2 J28.2 R28.1 | length 3096.6
  Bottom Layer w75: F28.2_1 1950,9015 2940,8025 J28.2@2940,6613.48
NetQ1_1: Q1.1 RGate2.1 | length 141.9
  Top Layer w15.75: RGate2.1 3711.5,7409.92 Q1.1
NetQ2_1: Q2.1 RGate1.1 | length 149
  Top Layer w11.81: Q2.1 3221.5,7416.93 RGate1.1
NetQ3_1: Q3.1 RGate3.1 | length 149
  Top Layer w15.75: Q3.1 2681.5,7416.93 RGate3.1
NetU1_6: U1.6 U1.10
PROG: PROG.1 R32.2 R33.1 U1.3 | length 464.2
  Top Layer w11.81: U1.3 2465.59,9155.23 2569.61,9259.25 2574.25,9259.25 R32.2 R33.1
SENSE: Q1.MB Q2.MB Q3.MB RSense.2 SENSE.1 U1.13 VD.1 | length 659.9
  Top Layer w11.81: U1.13 2491.18,8653.82 2515,8630 RSense.2@3090,8630
TIMER: CTimer.1 TIMER.1 U1.4 | length 191.4
  Top Layer w11.81: CTimer.1 2342.48,9085 2440,8987.48 U1.4
UVEN: R30.1 R31.1 U1.1 UVEN.1 | length 275.1
  Top Layer w11.81: U1.1 2516.77,9029.76 2587.01,9100 R31.1 R30.1
VBAT: C1.1 C2.2 D29.1 F21.1_1 F21.1_2 F22.1_1 F22.1_2 F23.1_1 F23.1_2 F24.1_1 F24.1_2 F25.1_1 F25.1_2 F26.1_1 F26.1_2 F27.1_1 F27.1_2 F28.1_1 F28.1_2 MP2.1 MP2.2 MP2.3 MP2.4 MP2.5 MP2.6 MP2.7 MP2.8 MP2.9 MP2.10 MP2.11 MP2.12 MP2.13 MP2.14 MP2.15 MP2.16 MP2.17 MP2.18 MP2.19 MP2.20 MP2.21 MP2.22 MP2.23 MP2.24 MP2.25 R30.2 R39.1 R40.1 RBypass.1 RSense.1 U1.14 VCC.1 | length 921.6
  Top Layer w15: R39.1 2375,9937.4 R40.1 2817.4,9937.4 ; U1.14 2616.5,8705 C1.1 2620,8709.49 2634.15,8723.64 2708.64,8723.64 2785,8800 ; R30.2 2815,9180
VREF: R32.1 U1.2 | length 447.3
  Top Layer w11.81: U1.2 2491.18,9149.97 2571.21,9230 2640,9230 2652.55,9242.55 2652.55,9274.56 R32.1
VS: D30.1 D31.2 F1.2_1 F1.2_2 F2.2_1 F2.2_2 F3.2_1 F3.2_2 F4.2_1 F4.2_2 F5.2_1 F5.2_2 F6.2_1 F6.2_2 F7.2_1 F7.2_2 F8.2_1 F8.2_2 F9.2_1 F9.2_2 F10.2_1 F10.2_2 F11.2_1 F11.2_2 F12.2_1 F12.2_2 F13.2_1 F13.2_2 F14.2_1 F14.2_2 F15.1_1 F15.1_2 F16.1_1 F16.1_2 F17.1_1 F17.1_2 F18.1_1 F18.1_2 F19.1_1 F19.1_2 F20.1_1 F20.1_2 OUT.1 Q1.3 Q2.3 Q3.3 RBypass.2 U1.11 | length 1293
  Top Layer w13.78: 2405,8535 2440,8570 U1.11
  Top Layer w15.75: 2265,7484.51 2265,8080 2405,8220 2405,8535
~FLT: D33.2 FLT.1 U1.9 | length 1313.7
  Top Layer w11.81: U1.9 2388.82,8796.18 2205,8980 2205,9380 2551.44,9726.44 2551.44,9797.07 D33.2
~PG: D32.2 PG.1 U1.8 | length 1221.5
  Top Layer w13.78: D32.2 2150,9668.5 2150,8980 2363.23,8766.77 U1.8
pads on no net: J1.3 J2.3 J3.3 J4.3 J5.3 J6.3 J7.3 J8.3 J9.3 J10.3 J11.3 J12.3 J13.3 J14.3 J15.3 J16.3 J17.3 J18.3 J19.3 J20.3 J21.3 J22.3 J23.3 J24.3 J25.3 J26.3 J27.3 J28.3
copper on no net: | length 7.1
  Top Layer w11.81: 2095,11260 2100,11265

## Polygon pours and split planes (outlines as drawn)
VS on Top Layer "VS_L01_P003" (solid, pour order 3): 2249.87,7515 4335,7515 4335,6725 2249.87,6725
VBAT on Top Layer "VBAT_L01_P000" (solid, pour order 0): 2770,10245 3860,10245 3860,8745 2770,8745
VS on Top Layer "VS_L01_P004" (solid, pour order 4): 3925,10245 3925,9605 4130,9605 4290,9445 5295,9445 5295,10240
SENSE on Top Layer "SENSE_L01_P002" (solid, pour order 2): 2675,8685 4125,8685 4125,7625 2445,7625 2445,8100 2675,8330
VS on Power "VS_L03_P007" (solid, pour order 7): 2250,7525 3925,9200 3925,10450 5425,10450 5425,1050 1050,1050 1075,1075 1075,4600 2100,4600 2250,4750
VBAT on Power "VBAT_L03_P005" (solid, pour order 5): 1050,4750 1850,4750 1850,9350 2075,9575 3700,9575 3700,10450 1050,10450
NetF7_1_1 on Bottom Layer "NETF7_1_1_L04_P033" (solid, pour order 33): 3510,4425 3510,4640 3705,4640 3705,4425
NetF3_1_1 on Bottom Layer "NETF3_1_1_L04_P012" (solid, pour order 12): 3520,5815 3520,6030 3715,6030 3715,5815
NetF2_1_1 on Bottom Layer "NETF2_1_1_L04_P011" (solid, pour order 11): 3520,6160 3520,6380 3715,6380 3715,6160
NetF1_1_1 on Bottom Layer "NETF1_1_1_L04_P010" (solid, pour order 10): 3520,6540 3520,6765 3690,6765 3690,6540
NetF4_1_1 on Bottom Layer "NETF4_1_1_L04_P030" (solid, pour order 30): 3515,5480 3515,5695 3710,5695 3710,5480
NetF18_2_1 on Bottom Layer "NETF18_2_1_L04_P044" (solid, pour order 44): 2795,3055 2795,3270 2990,3270 2990,3055
NetF15_2_1 on Bottom Layer "NETF15_2_1_L04_P041" (solid, pour order 41): 2810,2020 2810,2235 3005,2235 3005,2020
NetF11_1_1 on Bottom Layer "NETF11_1_1_L04_P037" (solid, pour order 37): 3510,3070 3510,3285 3705,3285 3705,3070
NetF8_1_1 on Bottom Layer "NETF8_1_1_L04_P034" (solid, pour order 34): 3515,4115 3515,4330 3710,4330 3710,4115
NetF12_1_1 on Bottom Layer "NETF12_1_1_L04_P038" (solid, pour order 38): 3510,2715 3510,2930 3705,2930 3705,2715
NetF16_2_1 on Bottom Layer "NETF16_2_1_L04_P042" (solid, pour order 42): 2805,2360 2805,2575 3000,2575 3000,2360
NetF17_2_1 on Bottom Layer "NETF17_2_1_L04_P043" (solid, pour order 43): 2795,2710 2795,2925 2990,2925 2990,2710
NetF19_2_1 on Bottom Layer "NETF19_2_1_L04_P045" (solid, pour order 45): 2790,3400 2790,3615 2985,3615 2985,3400
NetF20_2_1 on Bottom Layer "NETF20_2_1_L04_P046" (solid, pour order 46): 2795,3775 2795,3990 2990,3990 2990,3775
NetF14_1_1 on Bottom Layer "NETF14_1_1_L04_P040" (solid, pour order 40): 3515,2015 3515,2230 3710,2230 3710,2015
NetF13_1_1 on Bottom Layer "NETF13_1_1_L04_P039" (solid, pour order 39): 3505,2360 3505,2575 3700,2575 3700,2360
NetF10_1_1 on Bottom Layer "NETF10_1_1_L04_P036" (solid, pour order 36): 3515,3420 3515,3635 3710,3635 3710,3420
NetF9_1_1 on Bottom Layer "NETF9_1_1_L04_P035" (solid, pour order 35): 3515,3765 3515,3980 3710,3980 3710,3765
NetF6_1_1 on Bottom Layer "NETF6_1_1_L04_P032" (solid, pour order 32): 3510,4775 3510,4990 3705,4990 3705,4775
NetF5_1_1 on Bottom Layer "NETF5_1_1_L04_P031" (solid, pour order 31): 3510,5130 3510,5345 3705,5345 3705,5130

## Other copper
Top Layer:

## Silkscreen, mask and mechanical layers (free items; w line width, h text height)
Top Overlay:
  text "VBAT(+)" at 3600,10025 h100
  text "PGOOD" at 2074,10004 h50
  text "FAULT" at 2444,10004 h50
  text "GND(-)" at 3625,1330 h100

## Text inside footprints (layer, text, board x,y; h text height)
C2: Top Overlay "+" at 4071.85,9365.32 h40; Top 3D Body "+" at 4071.85,9365.32 h40
D1: Top Overlay "+" at 14317.99,2458.19 h24; Top 3D Body "+" at 14317.99,2458.19 h24
D2: Top Overlay "+" at 14507.99,2458.19 h24; Top 3D Body "+" at 14507.99,2458.19 h24
D3: Top Overlay "+" at 14697.99,2458.19 h24; Top 3D Body "+" at 14697.99,2458.19 h24
D4: Top Overlay "+" at 14887.99,2458.19 h24; Top 3D Body "+" at 14887.99,2458.19 h24
D5: Top Overlay "+" at 15077.99,2458.19 h24; Top 3D Body "+" at 15077.99,2458.19 h24
D6: Top Overlay "+" at 15267.99,2458.19 h24; Top 3D Body "+" at 15267.99,2458.19 h24
D7: Top Overlay "+" at 15457.99,2458.19 h24; Top 3D Body "+" at 15457.99,2458.19 h24
D8: Top Overlay "+" at 15642.99,2458.19 h24; Top 3D Body "+" at 15642.99,2458.19 h24
D9: Top Overlay "+" at 15832.99,2458.19 h24; Top 3D Body "+" at 15832.99,2458.19 h24
D10: Top Overlay "+" at 15946.81,2557.99 h24 r90; Top 3D Body "+" at 15946.81,2557.99 h24 r90
D11: Top Overlay "+" at 16242.99,2458.19 h24; Top 3D Body "+" at 16242.99,2458.19 h24
D12: Top Overlay "+" at 16366.81,2557.99 h24 r90; Top 3D Body "+" at 16366.81,2557.99 h24 r90
D13: Top Overlay "+" at 16586.81,2557.99 h24 r90; Top 3D Body "+" at 16586.81,2557.99 h24 r90
D14: Top Overlay "+" at 16806.81,2557.99 h24 r90; Top 3D Body "+" at 16806.81,2557.99 h24 r90
D15: Top Overlay "+" at 7846.81,2361.5 h24 r90; Top 3D Body "+" at 7846.81,2361.5 h24 r90
D16: Top Overlay "+" at 7836.81,2661.5 h24 r90; Top 3D Body "+" at 7836.81,2661.5 h24 r90
D17: Top Overlay "+" at 8376.81,2557.99 h24 r90; Top 3D Body "+" at 8376.81,2557.99 h24 r90
D18: Top Overlay "+" at 8596.81,2557.99 h24 r90; Top 3D Body "+" at 8596.81,2557.99 h24 r90
D19: Top Overlay "+" at 8816.81,2557.99 h24 r90; Top 3D Body "+" at 8816.81,2557.99 h24 r90
D20: Top Overlay "+" at 9036.81,2557.99 h24 r90; Top 3D Body "+" at 9036.81,2557.99 h24 r90
D21: Top Overlay "+" at 9266.81,2557.99 h24 r90; Top 3D Body "+" at 9266.81,2557.99 h24 r90
D22: Top Overlay "+" at 9476.81,2557.99 h24 r90; Top 3D Body "+" at 9476.81,2557.99 h24 r90
D23: Top Overlay "+" at 9706.81,2557.99 h24 r90; Top 3D Body "+" at 9706.81,2557.99 h24 r90
D24: Top Overlay "+" at 9936.81,2557.99 h24 r90; Top 3D Body "+" at 9936.81,2557.99 h24 r90
D25: Top Overlay "+" at 10166.81,2557.99 h24 r90; Top 3D Body "+" at 10166.81,2557.99 h24 r90
D26: Top Overlay "+" at 10396.81,2557.99 h24 r90; Top 3D Body "+" at 10396.81,2557.99 h24 r90
D27: Top Overlay "+" at 10626.81,2557.99 h24 r90; Top 3D Body "+" at 10626.81,2557.99 h24 r90
D28: Top Overlay "+" at 10856.81,2557.99 h24 r90; Top 3D Body "+" at 10856.81,2557.99 h24 r90
D32: Top Overlay "+" at 2258.19,9757.01 h24 r270; Top 3D Body "+" at 2258.19,9757.01 h24 r270
D33: Top Overlay "+" at 2538.19,9767.01 h24 r270; Top 3D Body "+" at 2538.19,9767.01 h24 r270
U1: Top Overlay "*" at 2525.74,8957.5 h50 r270; Top 3D Body "*" at 2487.5,8906 h50 r270